# Altium PCB ESP32-C3FH4-v1.3.PcbDoc (part 2 of 2)
Units mil, origin at the board's own origin, x right, y up, seen from the top; angles counter-clockwise.
Board outline 1418.46 x 1854.93 mil, 4 copper layers (Top Layer, GND, POWER, Bottom Layer), stack 30.634 mil thick; 59 components, 46 nets, 256 pads, 119 vias.
Unrouted connection lines stored in the file: 2.
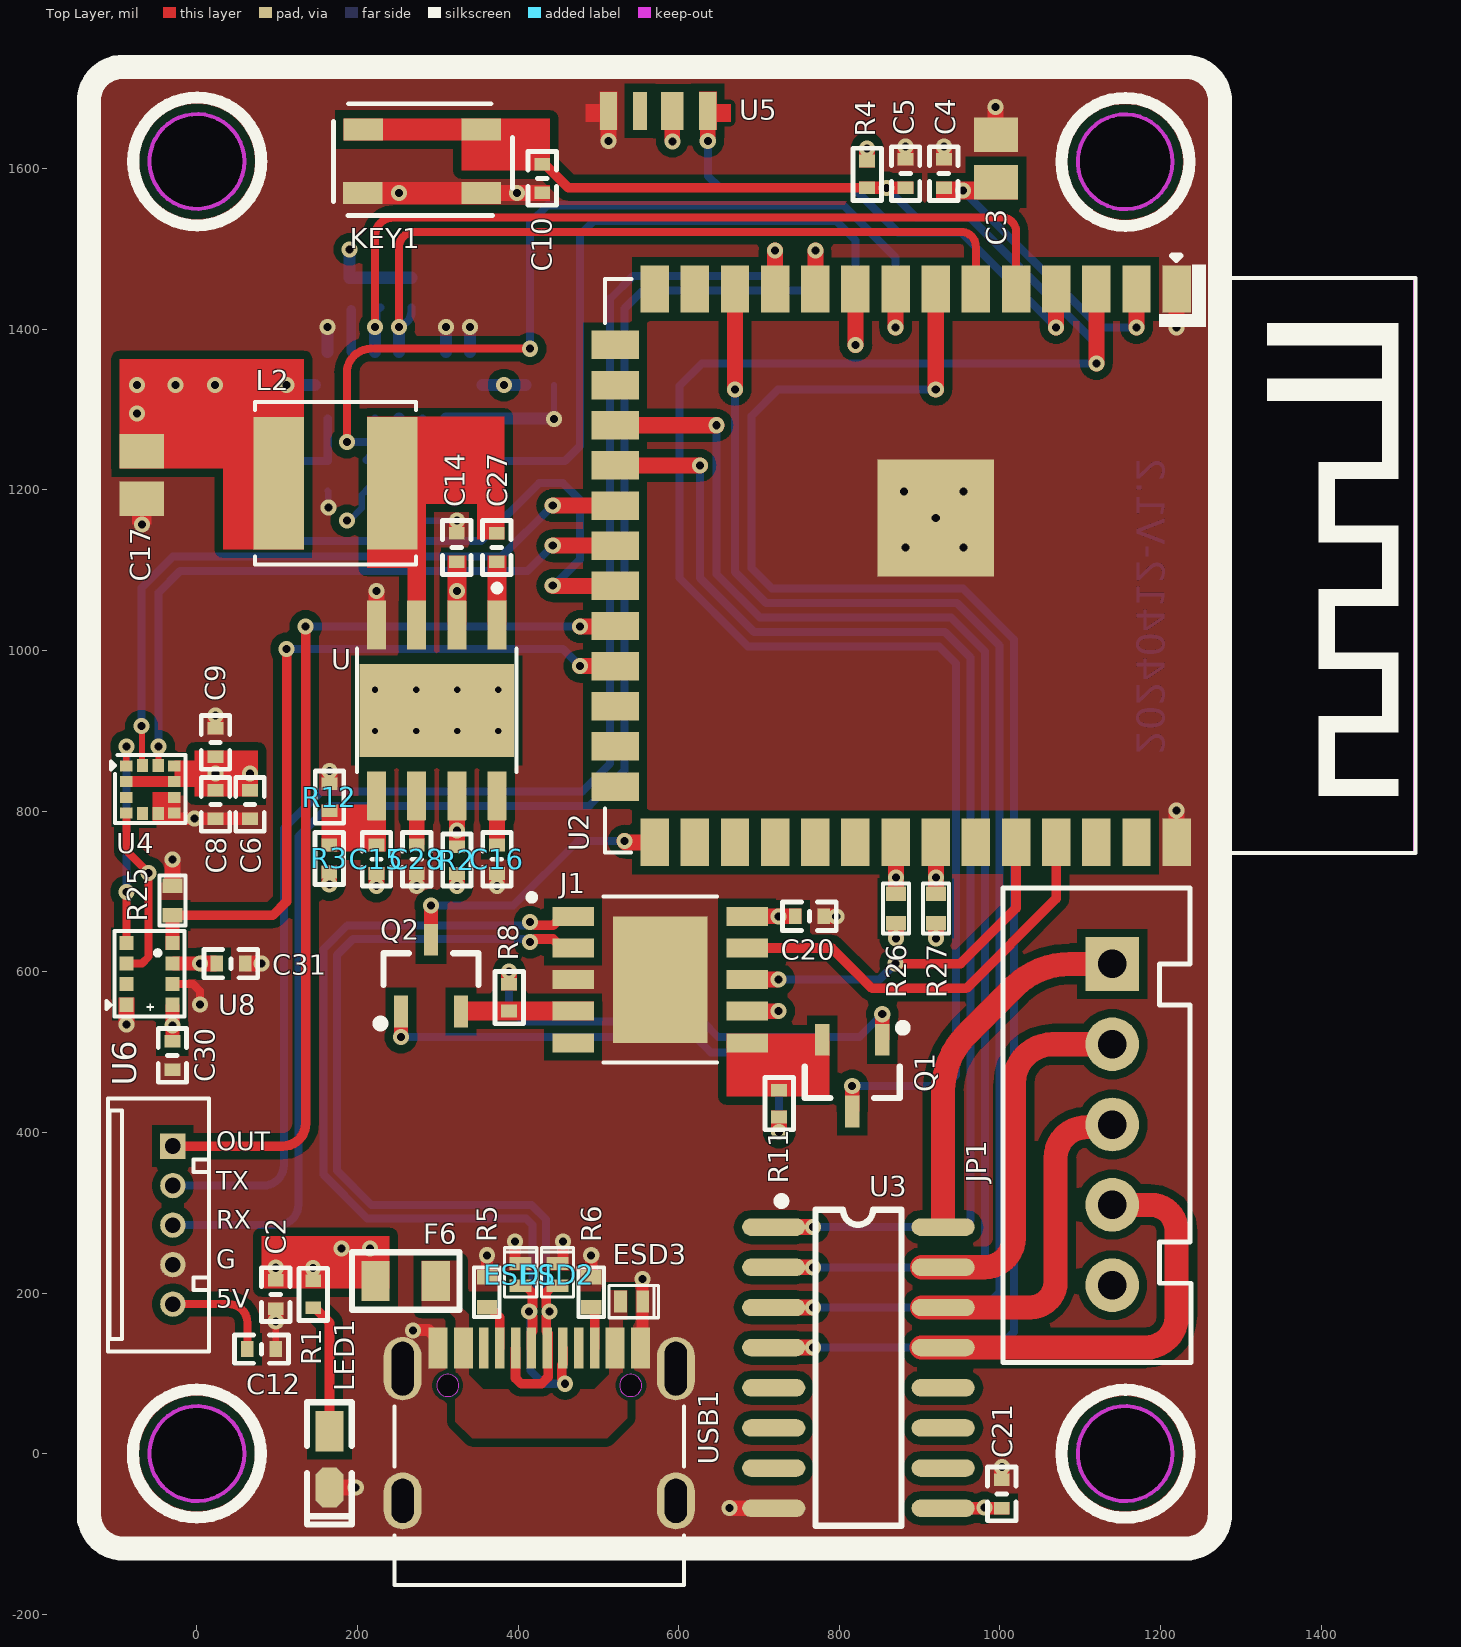
[diagram p0: Top Layer view]

## Silkscreen, mask and mechanical layers (free items; w line width, h text height) (continued)
Top Overlay: (continued)
  lines w30: -134.51,1681.49 cw(c-92.21,1684.49) -95.21,1726.79 1231.89,1726.77 ; -134.21,-83.02 -134.21,1679.18 ; -134.21,-78.84 ccw(c-91.91,-75.84) -88.91,-118.14 1236.19,-118.12 ; 1228.64,1726.59 cw(c1231.64,1684.29) 1273.94,1687.29 ; 1234.44,-118.12 ccw(c1231.44,-75.82) 1273.74,-72.82 ; 1273.84,-72.82 1273.84,1685.57
  text "OUT" at 23.92,369.5 h40
  text "TX" at 23.92,320.8 h40
  text "RX" at 23.92,272.1 h40
  text "G" at 23.92,222.44 h40
  text "5V" at 23.92,173.26 h40
Bottom Overlay:
  drawing of 17 lines, arcs and shapes, not listed
  text "S" at 717.94,1289.69 h60 r270
  text "N" at 717.94,1188.33 h60 r270
  text "O" at 717.94,1066.97 h60 r270
  text "I" at 717.94,995.61 h60 r270
  text "T" at 717.94,894.25 h60 r270
  text "U" at 717.94,792.89 h60 r270
  text "L" at 717.94,691.53 h60 r270
  text "1C" at 1246,589.54 h45
  text "O" at 717.94,580.17 h60 r270
  text "2C" at 1241.2,496.92 h45
  text "S" at 717.94,468.8 h60 r270
  text "3C" at 1240.9,395.77 h45
  text "4C" at 1246.98,289.15 h45
  text "5V" at 1246,188.5 h45
Dimensions:
  drawing of 295 lines, arcs and shapes, not listed
  text "Layer" at -439.42,4615 h60
  text "Name" at -29.51,4615 h60
  text "Material" at 900.23,4615 h60
  text "Thickness" at 1760,4615 h60
  text "Constant" at 2409.84,4615 h60
  text "Board Layer Stack" at 2979.7,4615 h60
  text "Top Overlay" at -29.51,4495 h60
  text "Top Solder" at -29.51,4375 h60
  text "Solder Resist" at 900.23,4375 h60
  text "0.010mm" at 1760,4375 h60
  text "3.5" at 2409.84,4375 h60
  text "1" at -439.42,4255 h60
  text "Top Layer" at -29.51,4255 h60
  text "0.036mm" at 1760,4255 h60
  text "Dielectric 1" at -29.51,4135 h60
  text "FR-4" at 900.23,4135 h60
  text "0.254mm" at 1760,4135 h60
  text "4.2" at 2409.84,4135 h60
  text "2" at -439.42,4015 h60
  text "GND" at -29.51,4015 h60
  text "0.036mm" at 1760,4015 h60
  text "Dielectric 3" at -29.51,3895 h60
  text "0.127mm" at 1760,3895 h60
  text "4.2" at 2409.84,3895 h60
  text "3" at -439.42,3775 h60
  text "POWER" at -29.51,3775 h60
  text "0.036mm" at 1760,3775 h60
  text "Dielectric 2" at -29.51,3655 h60
  text "0.254mm" at 1760,3655 h60
  text "4.2" at 2409.84,3655 h60
  text "4" at -439.42,3535 h60
  text "Bottom Layer" at -29.51,3535 h60
  text "0.036mm" at 1760,3535 h60
  text "Bottom Solder" at -29.51,3415 h60
  text "Solder Resist" at 900.23,3415 h60
  text "0.010mm" at 1760,3415 h60
  text "3.5" at 2409.84,3415 h60
  text "Bottom Overlay" at -29.51,3295 h60
  text "Total board thickness:" at -439.42,3175 h60
  text "0.798mm" at 1760,3175 h60
Drill Drawing:
  circle w10: c1980.62,2237.28 r33.33
  lines w10: 1947.29,1603.94 1947.29,1620.61 1963.96,1637.28 1947.29,1653.94 1947.29,1670.61 1963.96,1670.61 1980.62,1653.94 1997.29,1670.61 2013.96,1670.61 2013.96,1653.94 1997.29,1637.28 2013.96,1620.61 2013.96,1603.94 1997.29,1603.94 1980.62,1620.61 1963.96,1603.94 1947.29,1603.94 ; 1947.29,1753.94 2013.96,1753.94 2013.96,1820.61 1947.29,1820.61 1947.29,1753.94 ; 1947.29,1970.61 2013.96,1970.61 1980.62,1903.94 1947.29,1970.61 ; 1947.29,2053.94 2013.96,2053.94 2013.96,2120.61 1947.29,2120.61 1947.29,2053.94 ; 1947.29,2370.61 1963.96,2370.61 1980.62,2353.94 1997.29,2370.61 2013.96,2370.61 1997.29,2387.28 2013.96,2403.94 1997.29,2403.94 1980.62,2420.61 1963.96,2403.94 1947.29,2403.94 1963.96,2387.28 1947.29,2370.61 ; 1960.62,1767.28 2000.62,1767.28 2000.62,1807.28 1960.62,1807.28 1960.62,1767.28
  lines w15: 1887.5,1558.94 13998.07,1558.94 ; 1887.5,2458.94 13998.07,2458.94 ; 2438.38,1408.94 2438.38,2608.94 ; 3018.22,1408.94 3018.22,2608.94 ; 4117.9,1408.94 4117.9,2608.94 ; 4623.78,1408.94 4623.78,2608.94 ; 5357.58,1408.94 5357.58,2608.94 ; 6857.13,1408.94 6857.13,2608.94 ; 7446.98,1408.94 7446.98,2608.94 ; 8192.78,1408.94 8192.78,2608.94 ; 10432.09,1408.94 10432.09,2608.94 ; 11285.85,1408.94 11285.85,2608.94 ; 12619.46,1408.94 12619.46,2608.94 ; 1887.5,1408.94 13998.07,1408.94 13998.07,2608.94 1887.5,2608.94 1887.5,1408.94
  text "Symbol" at 1977.5,2503.94 h72
  text "Count" at 2483.38,2503.94 h72
  text "Hole Size" at 3063.22,2503.94 h72
  text "Plated" at 4162.9,2503.94 h72
  text "Hole Type" at 4668.78,2503.94 h72
  text "Drill Layer Pair" at 5402.58,2503.94 h72
  text "Via/Pad" at 6902.13,2503.94 h72
  text "Pad Shape" at 7491.98,2503.94 h72
  text "Template" at 8237.78,2503.94 h72
  text "Description" at 10477.09,2503.94 h72
  text "Hole Tolerance (+)" at 11330.85,2503.94 h72
  text "Hole Tolerance (-)" at 12664.46,2503.94 h72
  text "2" at 2483.38,2353.94 h60
  text "27.56mil (0.700mm)" at 3063.22,2353.94 h60
  text "PTH" at 4162.9,2353.94 h60
  text "Slot" at 4668.78,2353.94 h60
  text "Top Layer - Bottom Layer" at 5402.58,2353.94 h60
  text "Pad" at 6902.13,2353.94 h60
  text "Rounded" at 7491.98,2353.94 h60
  text "r120_180h70_140r60m130_190mx130_190p0" at 8237.78,2353.94 h60
  text "2" at 2483.38,2203.94 h60
  text "27.56mil (0.700mm)" at 3063.22,2203.94 h60
  text "PTH" at 4162.9,2203.94 h60
  text "Slot" at 4668.78,2203.94 h60
  text "Top Layer - Bottom Layer" at 5402.58,2203.94 h60
  text "Pad" at 6902.13,2203.94 h60
  text "Rounded" at 7491.98,2203.94 h60
  text "(Mixed)" at 8237.78,2203.94 h60
  text "5" at 2483.38,2053.94 h60
  text "19.69mil (0.500mm)" at 3063.22,2053.94 h60
  text "PTH" at 4162.9,2053.94 h60
  text "Round" at 4668.78,2053.94 h60
  text "Top Layer - Bottom Layer" at 5402.58,2053.94 h60
  text "Pad" at 6902.13,2053.94 h60
  text "(Mixed)" at 7491.98,2053.94 h60
  text "(Mixed)" at 8237.78,2053.94 h60
  text "5" at 2483.38,1903.94 h60
  text "35.43mil (0.900mm)" at 3063.22,1903.94 h60
  text "PTH" at 4162.9,1903.94 h60
  text "Round" at 4668.78,1903.94 h60
  text "Top Layer - Bottom Layer" at 5402.58,1903.94 h60
  text "Pad" at 6902.13,1903.94 h60
  text "(Mixed)" at 7491.98,1903.94 h60
  text "(Mixed)" at 8237.78,1903.94 h60
  text "8" at 2483.38,1753.94 h60
  text "7.87mil (0.200mm)" at 3063.22,1753.94 h60
  text "PTH" at 4162.9,1753.94 h60
  text "Round" at 4668.78,1753.94 h60
  text "Top Layer - Bottom Layer" at 5402.58,1753.94 h60
  text "Pad" at 6902.13,1753.94 h60
  text "Rounded" at 7491.98,1753.94 h60
  text "c30h20" at 8237.78,1753.94 h60
  text "119" at 2483.38,1603.94 h60
  text "10.00mil (0.254mm)" at 3063.22,1603.94 h60
  text "PTH" at 4162.9,1603.94 h60
  text "Round" at 4668.78,1603.94 h60
  text "Top Layer - Bottom Layer" at 5402.58,1603.94 h60
  text "Via" at 6902.13,1603.94 h60
  text "Rounded" at 7491.98,1603.94 h60
  text "v51h25m0mx0" at 8237.78,1603.94 h60
  text "141 Total" at 2483.38,1453.94 h60
  text "Slot definitions :" at 1977.5,1308.97 h60
  text "Routed Path Length" at 3010.19,1308.97 h60
  text "= Calculated from tool start centre position to tool end centre position." at 4112.86,1308.97 h60
  text "Hole Length" at 3010.19,1208.99 h60
  text "= Routed Path Length + Tool Size = Slot length as defined in the PCB layout" at 3702.99,1208.99 h60
Board_outline:
  lines w30: -134.21,-83.02 -134.21,1679.18 ; 1273.84,-72.82 1273.84,1685.57 ; 1273.94,-72.82 1273.94,1685.57 ; -134.51,1681.49 cw(c-92.21,1684.49) -95.21,1726.79 ; -134.51,1681.49 cw(c-92.21,1684.49) -95.21,1726.79 ; -134.51,1681.49 cw(c-92.21,1684.49) -95.21,1726.79 ; -134.51,1681.49 cw(c-92.21,1684.49) -95.21,1726.79 ; -134.21,-82.02 -134.21,1680.18 ; -134.21,-82.02 -134.21,1680.18 ; -134.21,-82.02 -134.21,1680.18 ; -134.21,-78.84 ccw(c-91.91,-75.84) -88.91,-118.14 ; -134.21,-78.84 ccw(c-91.91,-75.84) -88.91,-118.14 ; -134.21,-78.84 ccw(c-91.91,-75.84) -88.91,-118.14 ; -134.21,-78.84 ccw(c-91.91,-75.84) -88.91,-118.14 ; -95.21,1726.77 1231.89,1726.77 ; -95.21,1726.77 1231.89,1726.77 ; -95.21,1726.77 1231.89,1726.77 ; -95.21,1726.77 1231.89,1726.77 ; -88.91,-118.12 1236.19,-118.12 ; -88.91,-118.12 1236.19,-118.12 ; -88.91,-118.12 1236.19,-118.12 ; -88.91,-118.12 1236.19,-118.12 ; 1228.64,1726.59 cw(c1231.64,1684.29) 1273.94,1687.29 ; 1228.64,1726.59 cw(c1231.64,1684.29) 1273.94,1687.29 ; 1228.64,1726.59 cw(c1231.64,1684.29) 1273.94,1687.29 ; 1228.64,1726.59 cw(c1231.64,1684.29) 1273.94,1687.29 ; 1234.44,-118.12 ccw(c1231.44,-75.82) 1273.74,-72.82 ; 1234.44,-118.12 ccw(c1231.44,-75.82) 1273.74,-72.82 ; 1234.44,-118.12 ccw(c1231.44,-75.82) 1273.74,-72.82 ; 1234.44,-118.12 ccw(c1231.44,-75.82) 1273.74,-72.82

## Dimensions
-134.21,1679.18 to 1273.84,1685.57 on Dimensions
1231.89,1726.77 to 1236.19,-118.12 on Dimensions